# Altium PCB Driver_BLDC.PcbDoc (part 2 of 4)
Units mm, origin at the board's own origin, x right, y up, seen from the top; angles counter-clockwise.
Board outline 320 x 180.01 mm, 2 copper layers (Top Layer, Bottom Layer), stack 1.371 mm thick; 421 components, 171 nets, 1112 pads, 449 vias.
Unrouted connection lines stored in the file: 1.
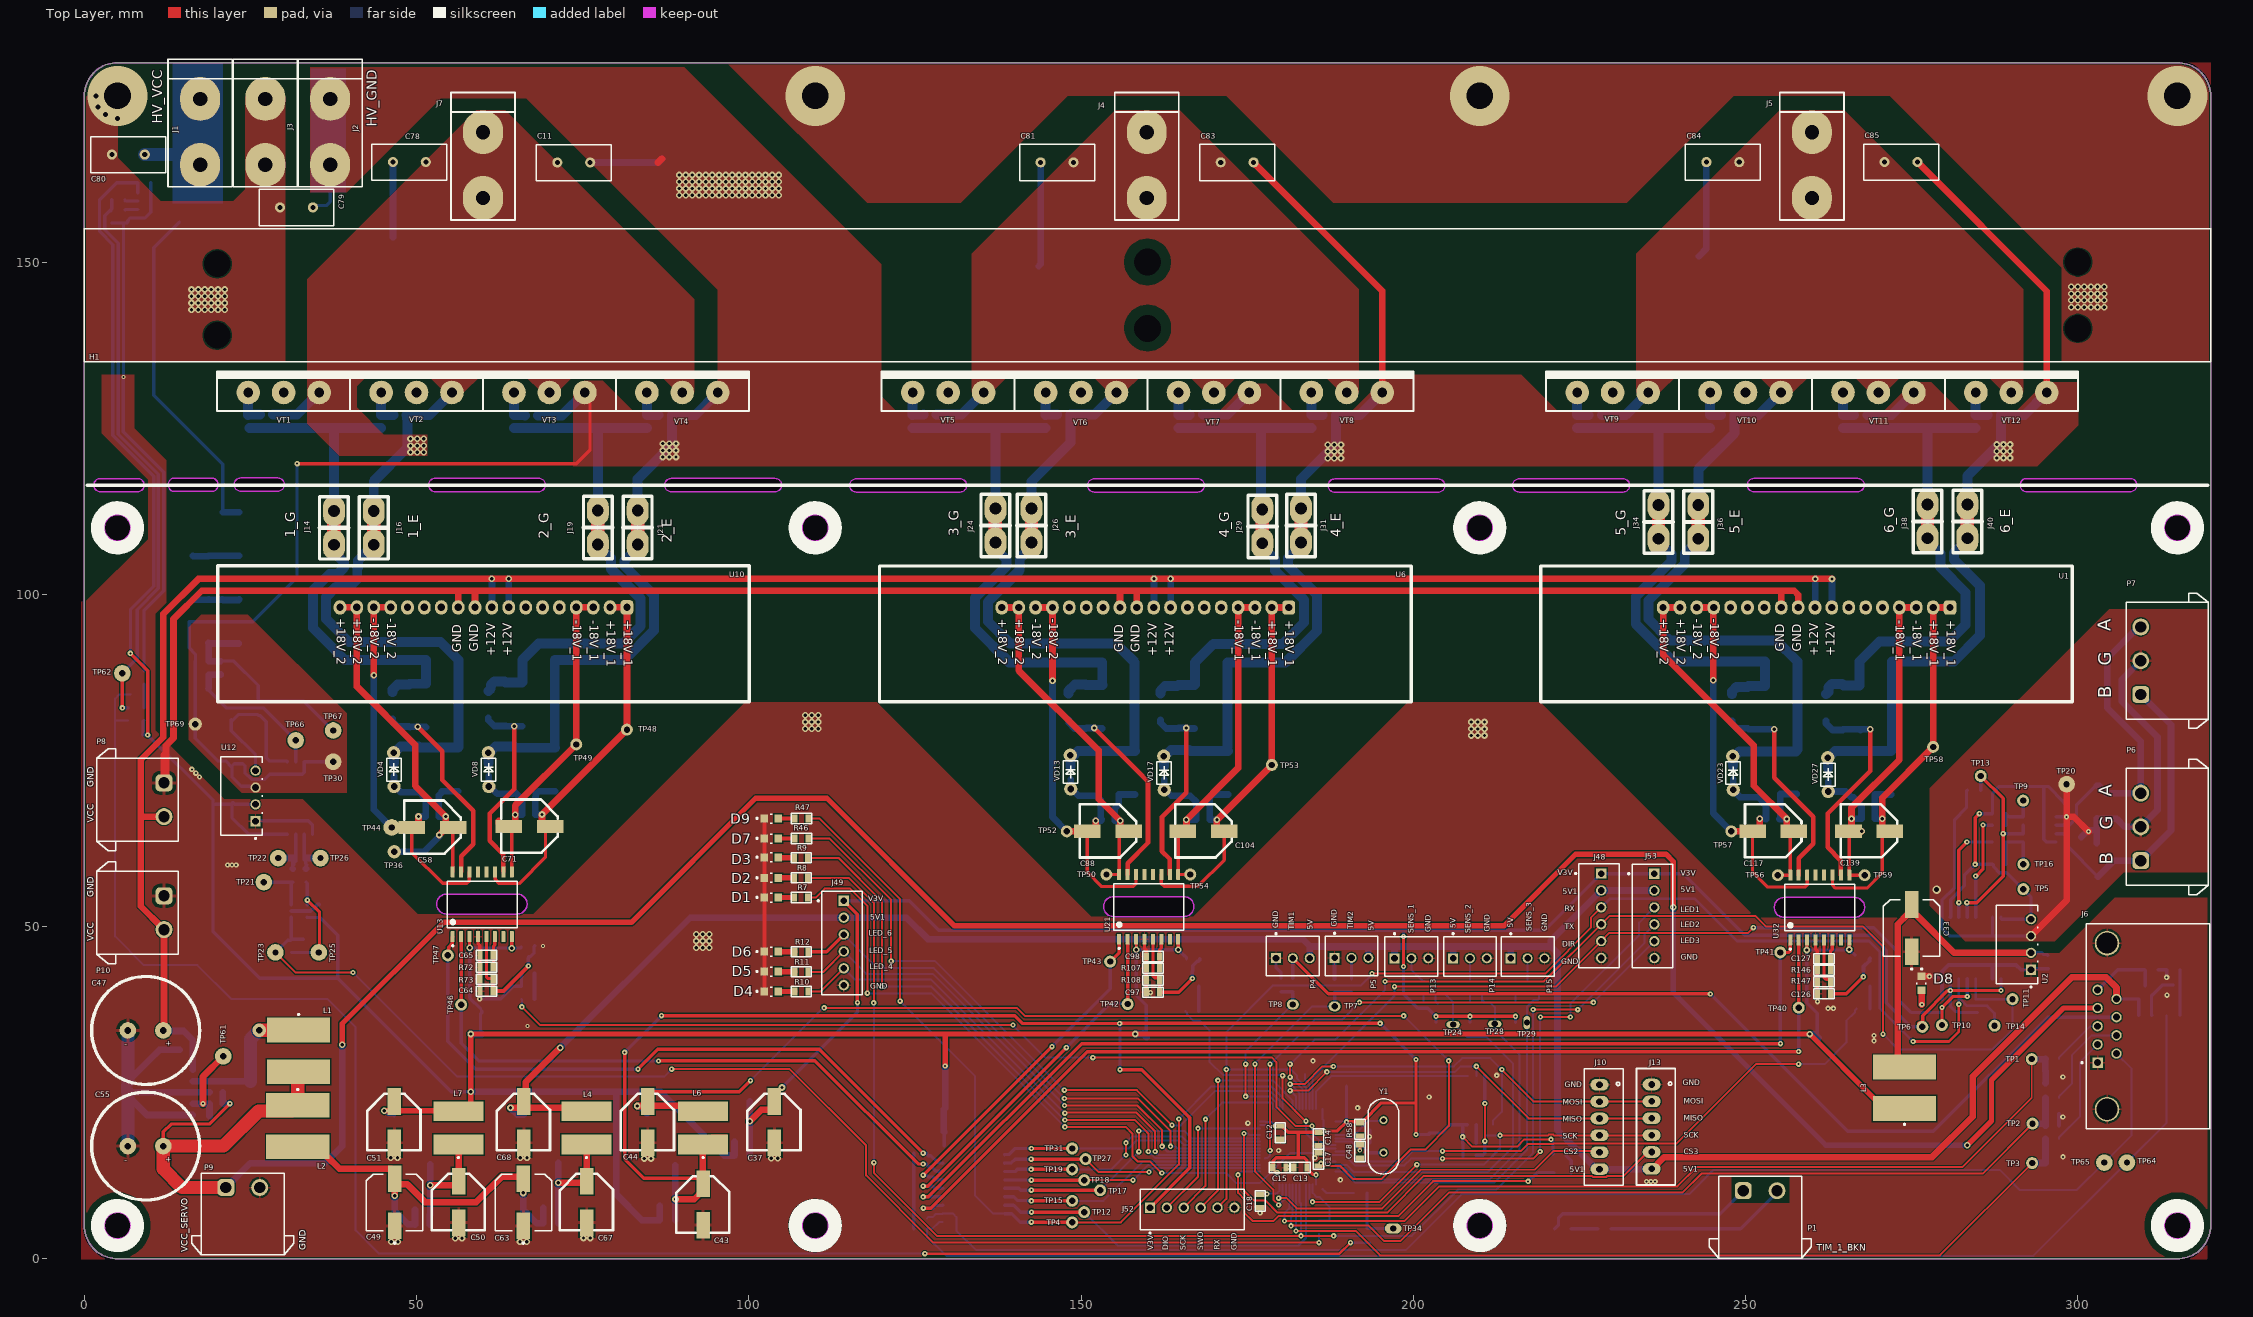
[diagram p0: Top Layer view]

## Part data (continued)
TP1 TP2 TP3 TP4 TP5 TP6 TP7 TP8 TP9 TP10 TP11 TP12 TP13 TP14 TP15 TP16 TP17 TP18 TP19 TP20 TP21 TP22 TP23 TP24 TP25 TP26 TP27 TP28 TP29 TP30 TP31 TP34 TP36 TP40 TP41 TP42 TP43 TP44 TP46 TP47 TP48 TP49 TP50 TP52 TP53 TP54 TP56 TP57 TP58 TP59 TP61 TP62 TP64 TP65 TP66 TP67 TP69: library part TP_PCB?, "Test_Point"
U1 U6 U10: library part DC-DC/12-18VDC, "Mounted by the customer"
U4: library part CMP-0534-00565-1, "Quad Channel Digital Isolator, 2.5 KV rms Insulation Rating, 10 Mbps Data Rate, 50 ns Delay, Industrial, 16-pin SOIC (RW-16), Tube", Manufacturer="Analog Devices", Max Operating Temp (degreesC)=125, Code_JEDEC=MS-013-AA, ComponentLink1Description="Manufacturer URL", ComponentLink1URL=http://www.analog.com/en/index.html, ComponentLink2Description=Datasheet, ComponentLink2URL=http://www.analog.com/static/imported-files/data_sheets/ADuM1400_1401_1402.pdf, ComponentLink3Description="Package Specification", ComponentLink3URL=http://www.analog.com/static/imported-files/packages/PKG_PDF/SOIC_WIDE%20%28RW%29/RW_16.pdf, ComponentLink4Description="URL Link1", ComponentLink4URL="Product URL:http://www.analog.com/en/interface-isolation/digital-isolators/adum1401/products/product.html", ComponentLink5Description="URL Link2", ComponentLink5URL="Reference Circuit:http://www.analog.com/en/interface-isolation/digital-isolators/adum1401/products/product.html#product-recommendations", DatasheetVersion="Rev. H", Max Data Rate=10Mbps, Mounting Technology="Surface Mount", PackageDescription="16-Pin Standard Small Outline Package, Body 10.3 x 7.5 mm, Pitch 1.27 mm", PackageReference=RW-16, PackageVersion="032707-B, 03/2007", PartNumber=ADUM1401BRWZ
U5: library part MCP6001T, Case/Package=SOT-23, Input Bias Current=1pA, Input Offset Voltage (Vos)=4.5mV, Max Operating Temperature=85°C, Max Supply Voltage=6V, Min Operating Temperature=-40°C, Min Supply Voltage=1.8V, Nominal Supply Current=100uA, Operating Supply Voltage=5.5V, Output Current=23mA, Package Quantity=1, Power Supply Rejection Ratio (PSRR)=86dB, Voltage Gain=112dB, Bandwidth=1MHz, Common Mode Rejection Ratio=60dB, Contact Plating=Tin, Gain Bandwidth Product=1MHz, Height=1.3mm, Lead Free="Lead Free", Length=3.1mm, Mount="Surface Mount", Number of Amplifiers=1, Number of Channels=1, Number of Circuits=1, Number of Elements=1, Number of Pins=5, Operating Supply Current=100uA, Output Current per Channel=23mA, Packaging="Tape and Reel", Radiation Hardening=No, REACH SVHC="No SVHC", Slew Rate=0.6V/µs, Unity Gain Bandwidth Product=1MHz, Voltage=6V, Width=1.8mm
U9 U11 U17 U19: library part AMS1117
U14: library part MCP6001T
U18: library part LM2576D2T-005G
VD2 VD6 VD11 VD15 VD21 VD25: library part Suppressor
VD4 VD8 VD13 VD17 VD23 VD27: library part ZENER, "1N4733A 5.1V"
VT1: library part "IGBT 60N120T", "IGBT 75N120T TO-247-3 /  / DNP"
VT2 VT3 VT4 VT5 VT6 VT7 VT8 VT9 VT10 VT11 VT12: library part "IGBT 60N120T", "IGBT 75N120T TO-264-3"
Y1: library part CMP-1749-00004-1, Case\Package=TO-251-3, Input Capacitance="350 pF", Max Operating Temperature="150 degC", Max Power Dissipation="2.5 W", Min Operating Temperature="-55 degC", Package Quantity=70, ComponentLink1Description="Manufacturer URL", ComponentLink1URL=http://www.foxonline.com/, ComponentLink2Description=Datasheet, ComponentLink2URL=http://www.foxonline.com/pdfs/hc49slf.pdf, DatasheetVersion=Mar-15, Elements=1, Height="6.1 mm", Length="6.6 mm", Mount="Through Hole", PackageDescription="2-Pin Through Hole Device, Body 11.35 x 4.65 mm, Pitch 4.88 mm", PackageReference=FOXSLF-2, Packaging=Rail/Tube, Pins=3, Radiation Hardening=No, Rds On Max="115 mohm", REACH SVHC="No SVHC", RoHSCompliant=true, Typical Rise Time="90 ns", Width="2.3 mm"

## Via types
v1: diameter 1, hole 0.5, Top Layer to Bottom Layer, 222 vias
v2: diameter 0.8, hole 0.3, Top Layer to Bottom Layer, 162 vias
v3: diameter 0.8, hole 0.3, Top Layer to Bottom Layer, tented both sides, 29 vias
v4: diameter 1, hole 0.5, Top Layer to Bottom Layer, tented both sides, 21 vias
v5: diameter 1.27, hole 0.711, Top Layer to Bottom Layer, 5 vias
v6: diameter 9, hole 4, Top Layer to Bottom Layer, 4 vias
v7: diameter 0.6, hole 0.3, Top Layer to Bottom Layer, 3 vias
v8: diameter 2, hole 1, Top Layer to Bottom Layer, 1 vias
v9: diameter 0.7, hole 0.3, Top Layer to Bottom Layer, tented both sides, 1 vias
v10: diameter 1, hole 0.54, Top Layer to Bottom Layer, 1 vias

## Text inside footprints (layer, text, board x,y; h text height)
U6: Top Overlay "+12V" at 161.408,90.655 h1.3 r90; Top Overlay "GND" at 158.868,91.295 h1.3 r90; Top Overlay "GND" at 156.328,91.295 h1.3 r90; Top Overlay "+12V" at 163.948,90.655 h1.3 r90; Top Overlay "-18V_2" at 145.184,96.349 h1.3 r270; Top Overlay "-18V_2" at 142.645,96.349 h1.3 r270; Top Overlay "+18V_2" at 140.105,96.349 h1.3 r270; Top Overlay "+18V_2" at 137.565,96.349 h1.3 r270; Top Overlay "+18V_1" at 180.743,96.07 h1.3 r270; Top Overlay "+18V_1" at 178.203,96.07 h1.3 r270; Top Overlay "-18V_1" at 175.663,96.07 h1.3 r270; Top Overlay "-18V_1" at 173.123,96.07 h1.3 r270; Bottom Overlay "+18V_1" at 180.743,89.861 h1.3 r270; Bottom Overlay "+18V_1" at 178.203,89.861 h1.3 r270; Bottom Overlay "-18V_1" at 175.663,89.861 h1.3 r270; Bottom Overlay "-18V_1" at 173.123,89.861 h1.3 r270; Bottom Overlay "+12V" at 162.53,90.679 h1.3 r270; Bottom Overlay "+12V" at 159.99,90.679 h1.3 r270; Bottom Overlay "GND" at 157.451,91.319 h1.3 r270; Bottom Overlay "GND" at 154.911,91.319 h1.3 r270; Bottom Overlay "-18V_2" at 145.184,89.584 h1.3 r270; Bottom Overlay "-18V_2" at 142.645,89.583 h1.3 r270; Bottom Overlay "+18V_2" at 140.105,89.583 h1.3 r270; Bottom Overlay "+18V_2" at 137.565,89.583 h1.3 r270
U10: Top Overlay "+12V" at 61.813,90.674 h1.3 r90; Top Overlay "GND" at 59.275,91.338 h1.3 r90; Top Overlay "GND" at 56.735,91.314 h1.3 r90; Top Overlay "+12V" at 64.353,90.674 h1.3 r90; Top Overlay "-18V_2" at 45.591,96.368 h1.3 r270; Top Overlay "-18V_2" at 43.051,96.368 h1.3 r270; Top Overlay "+18V_2" at 40.511,96.368 h1.3 r270; Top Overlay "+18V_2" at 37.971,96.368 h1.3 r270; Top Overlay "+18V_1" at 81.147,96.089 h1.3 r270; Top Overlay "+18V_1" at 78.607,96.089 h1.3 r270; Top Overlay "-18V_1" at 76.067,96.089 h1.3 r270; Top Overlay "-18V_1" at 73.528,96.089 h1.3 r270; Bottom Overlay "+18V_1" at 81.147,89.881 h1.3 r270; Bottom Overlay "+18V_1" at 78.607,89.881 h1.3 r270; Bottom Overlay "-18V_1" at 76.067,89.881 h1.3 r270; Bottom Overlay "-18V_1" at 73.528,89.881 h1.3 r270; Bottom Overlay "+12V" at 62.935,90.698 h1.3 r270; Bottom Overlay "+12V" at 60.396,90.698 h1.3 r270; Bottom Overlay "GND" at 57.858,91.338 h1.3 r270; Bottom Overlay "GND" at 55.318,91.338 h1.3 r270; Bottom Overlay "-18V_2" at 45.591,89.603 h1.3 r270; Bottom Overlay "-18V_2" at 43.051,89.602 h1.3 r270; Bottom Overlay "+18V_2" at 40.511,89.602 h1.3 r270; Bottom Overlay "+18V_2" at 37.971,89.602 h1.3 r270